# Altium PCB MOTHERBOARD.PcbDoc (part 1 of 2)
Units mm, origin at the board's own origin, x right, y up, seen from the top; angles counter-clockwise.
Board outline 100.2 x 110.2 mm, 2 copper layers (Top Layer, Bottom Layer); 252 components, 137 nets, 662 pads, 40 vias.
Unrouted connection lines stored in the file: 342.
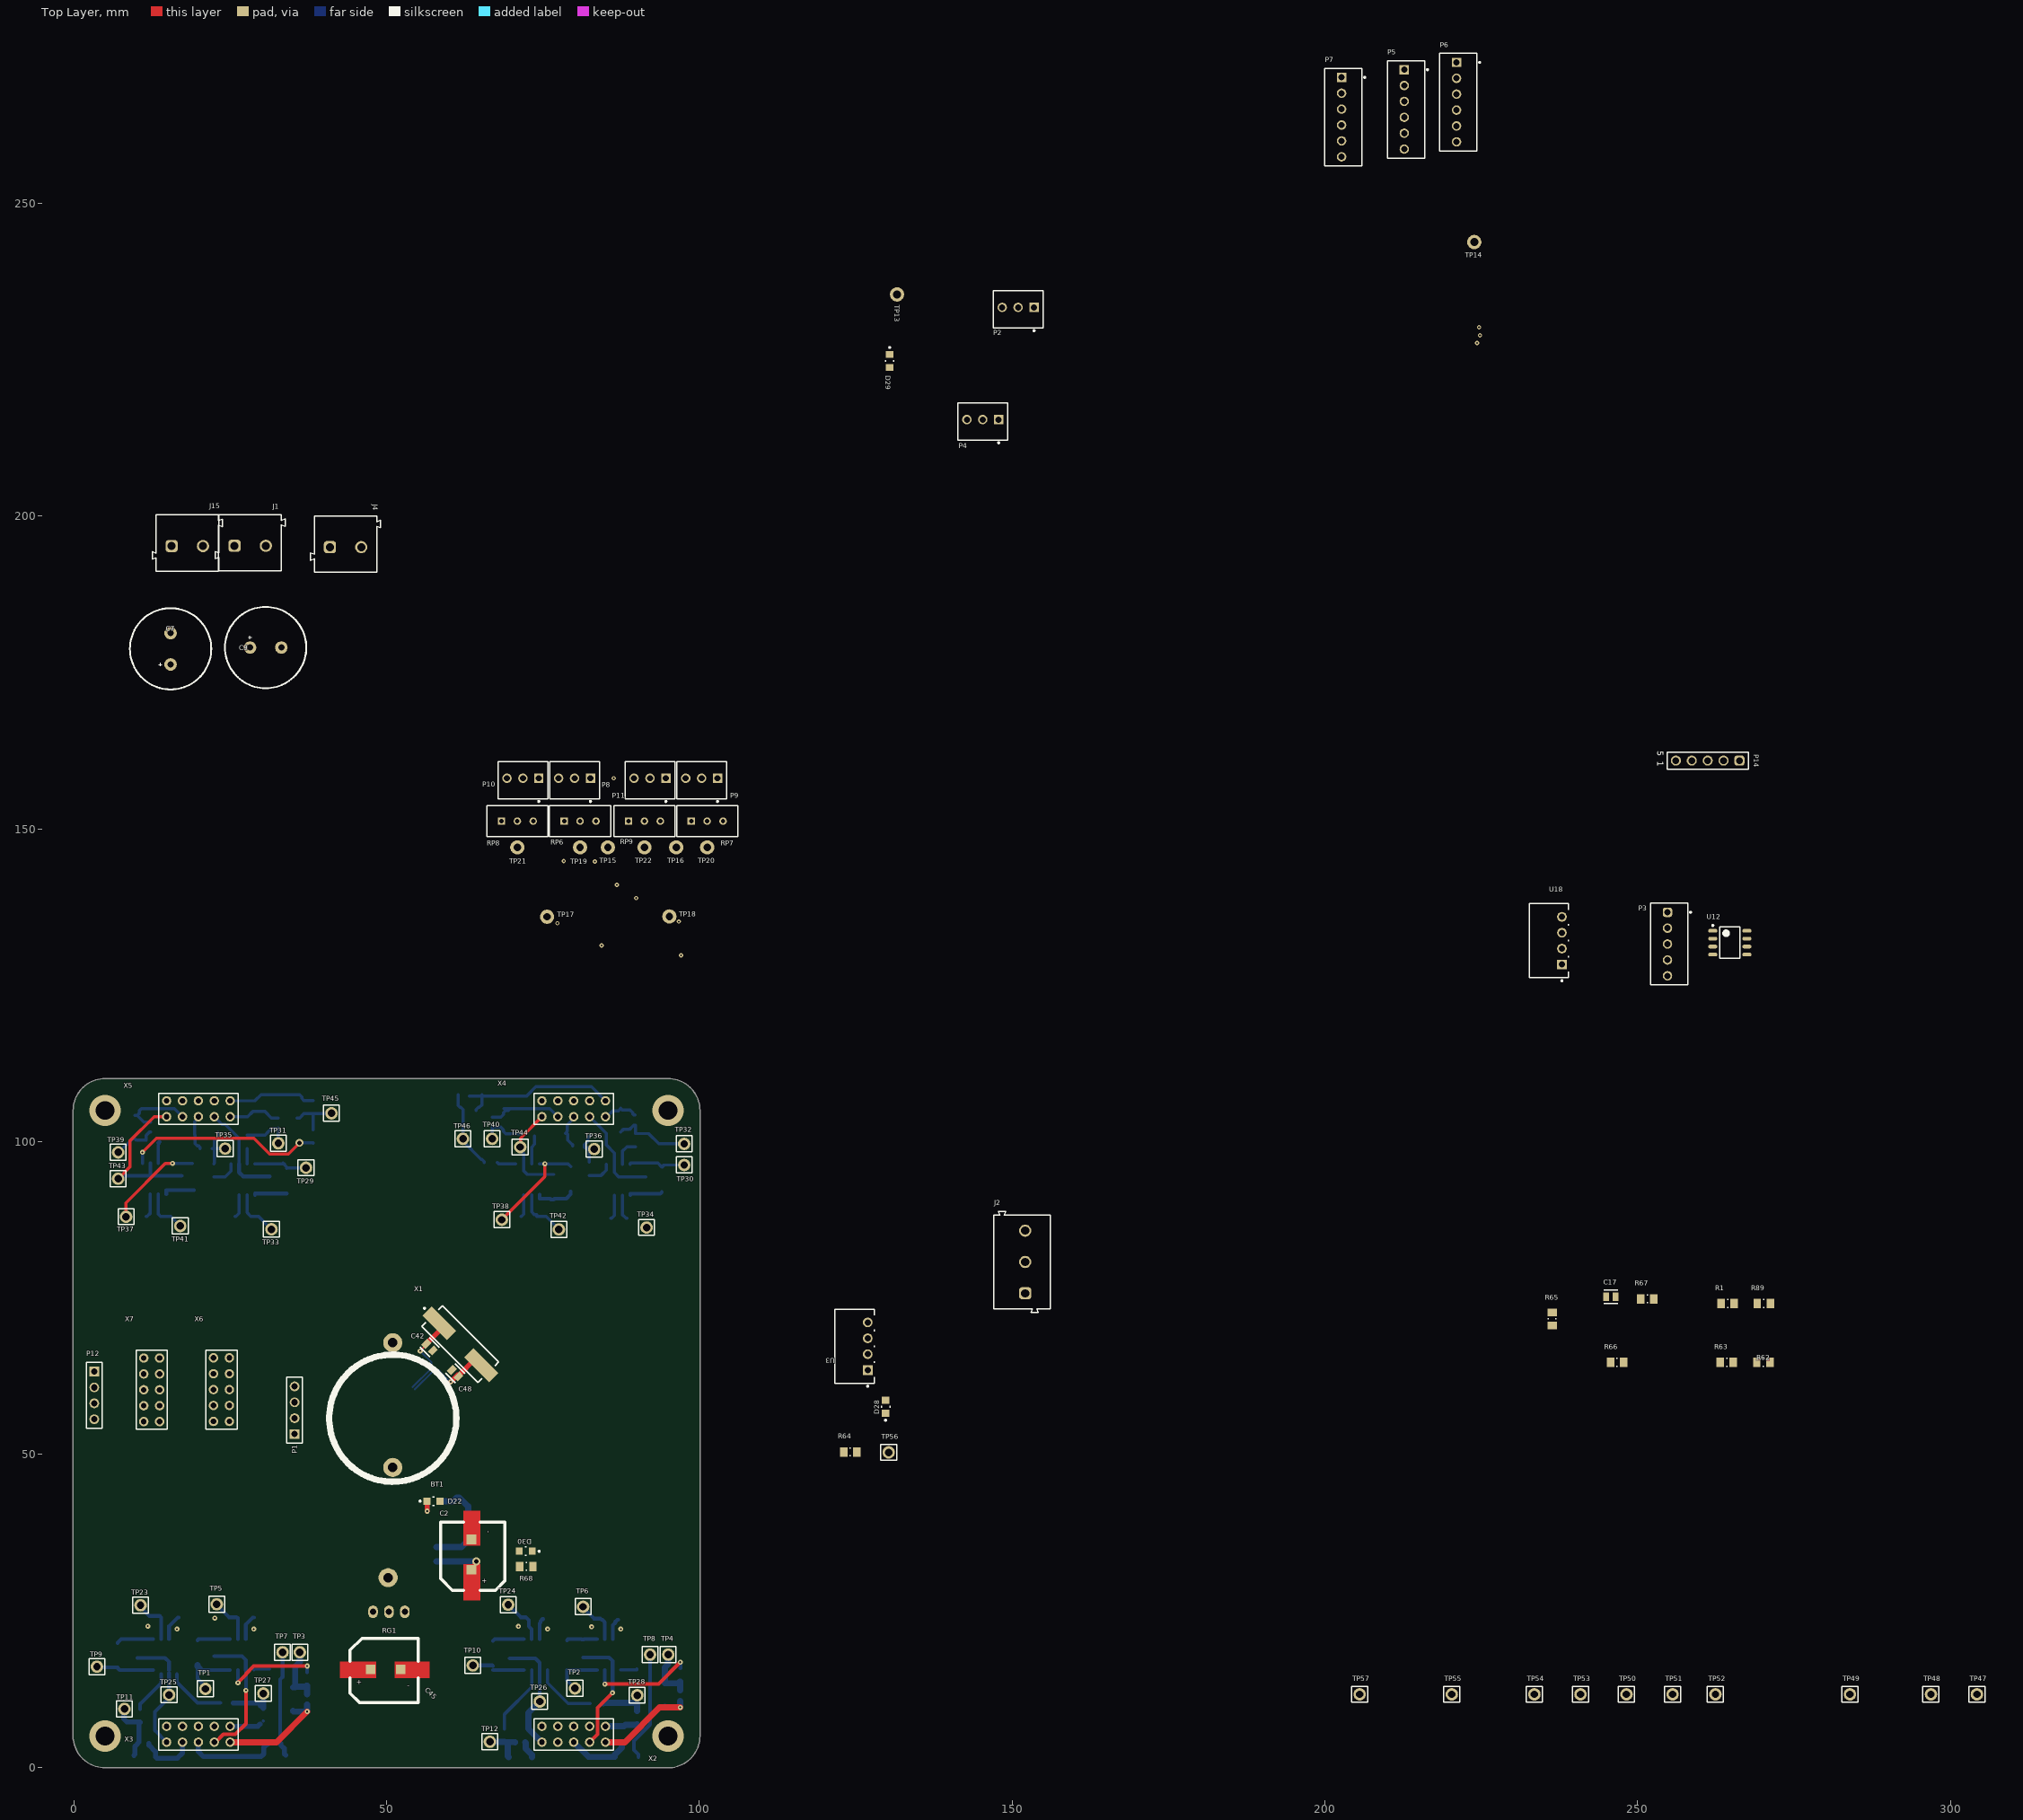
[diagram p0: Top Layer view]
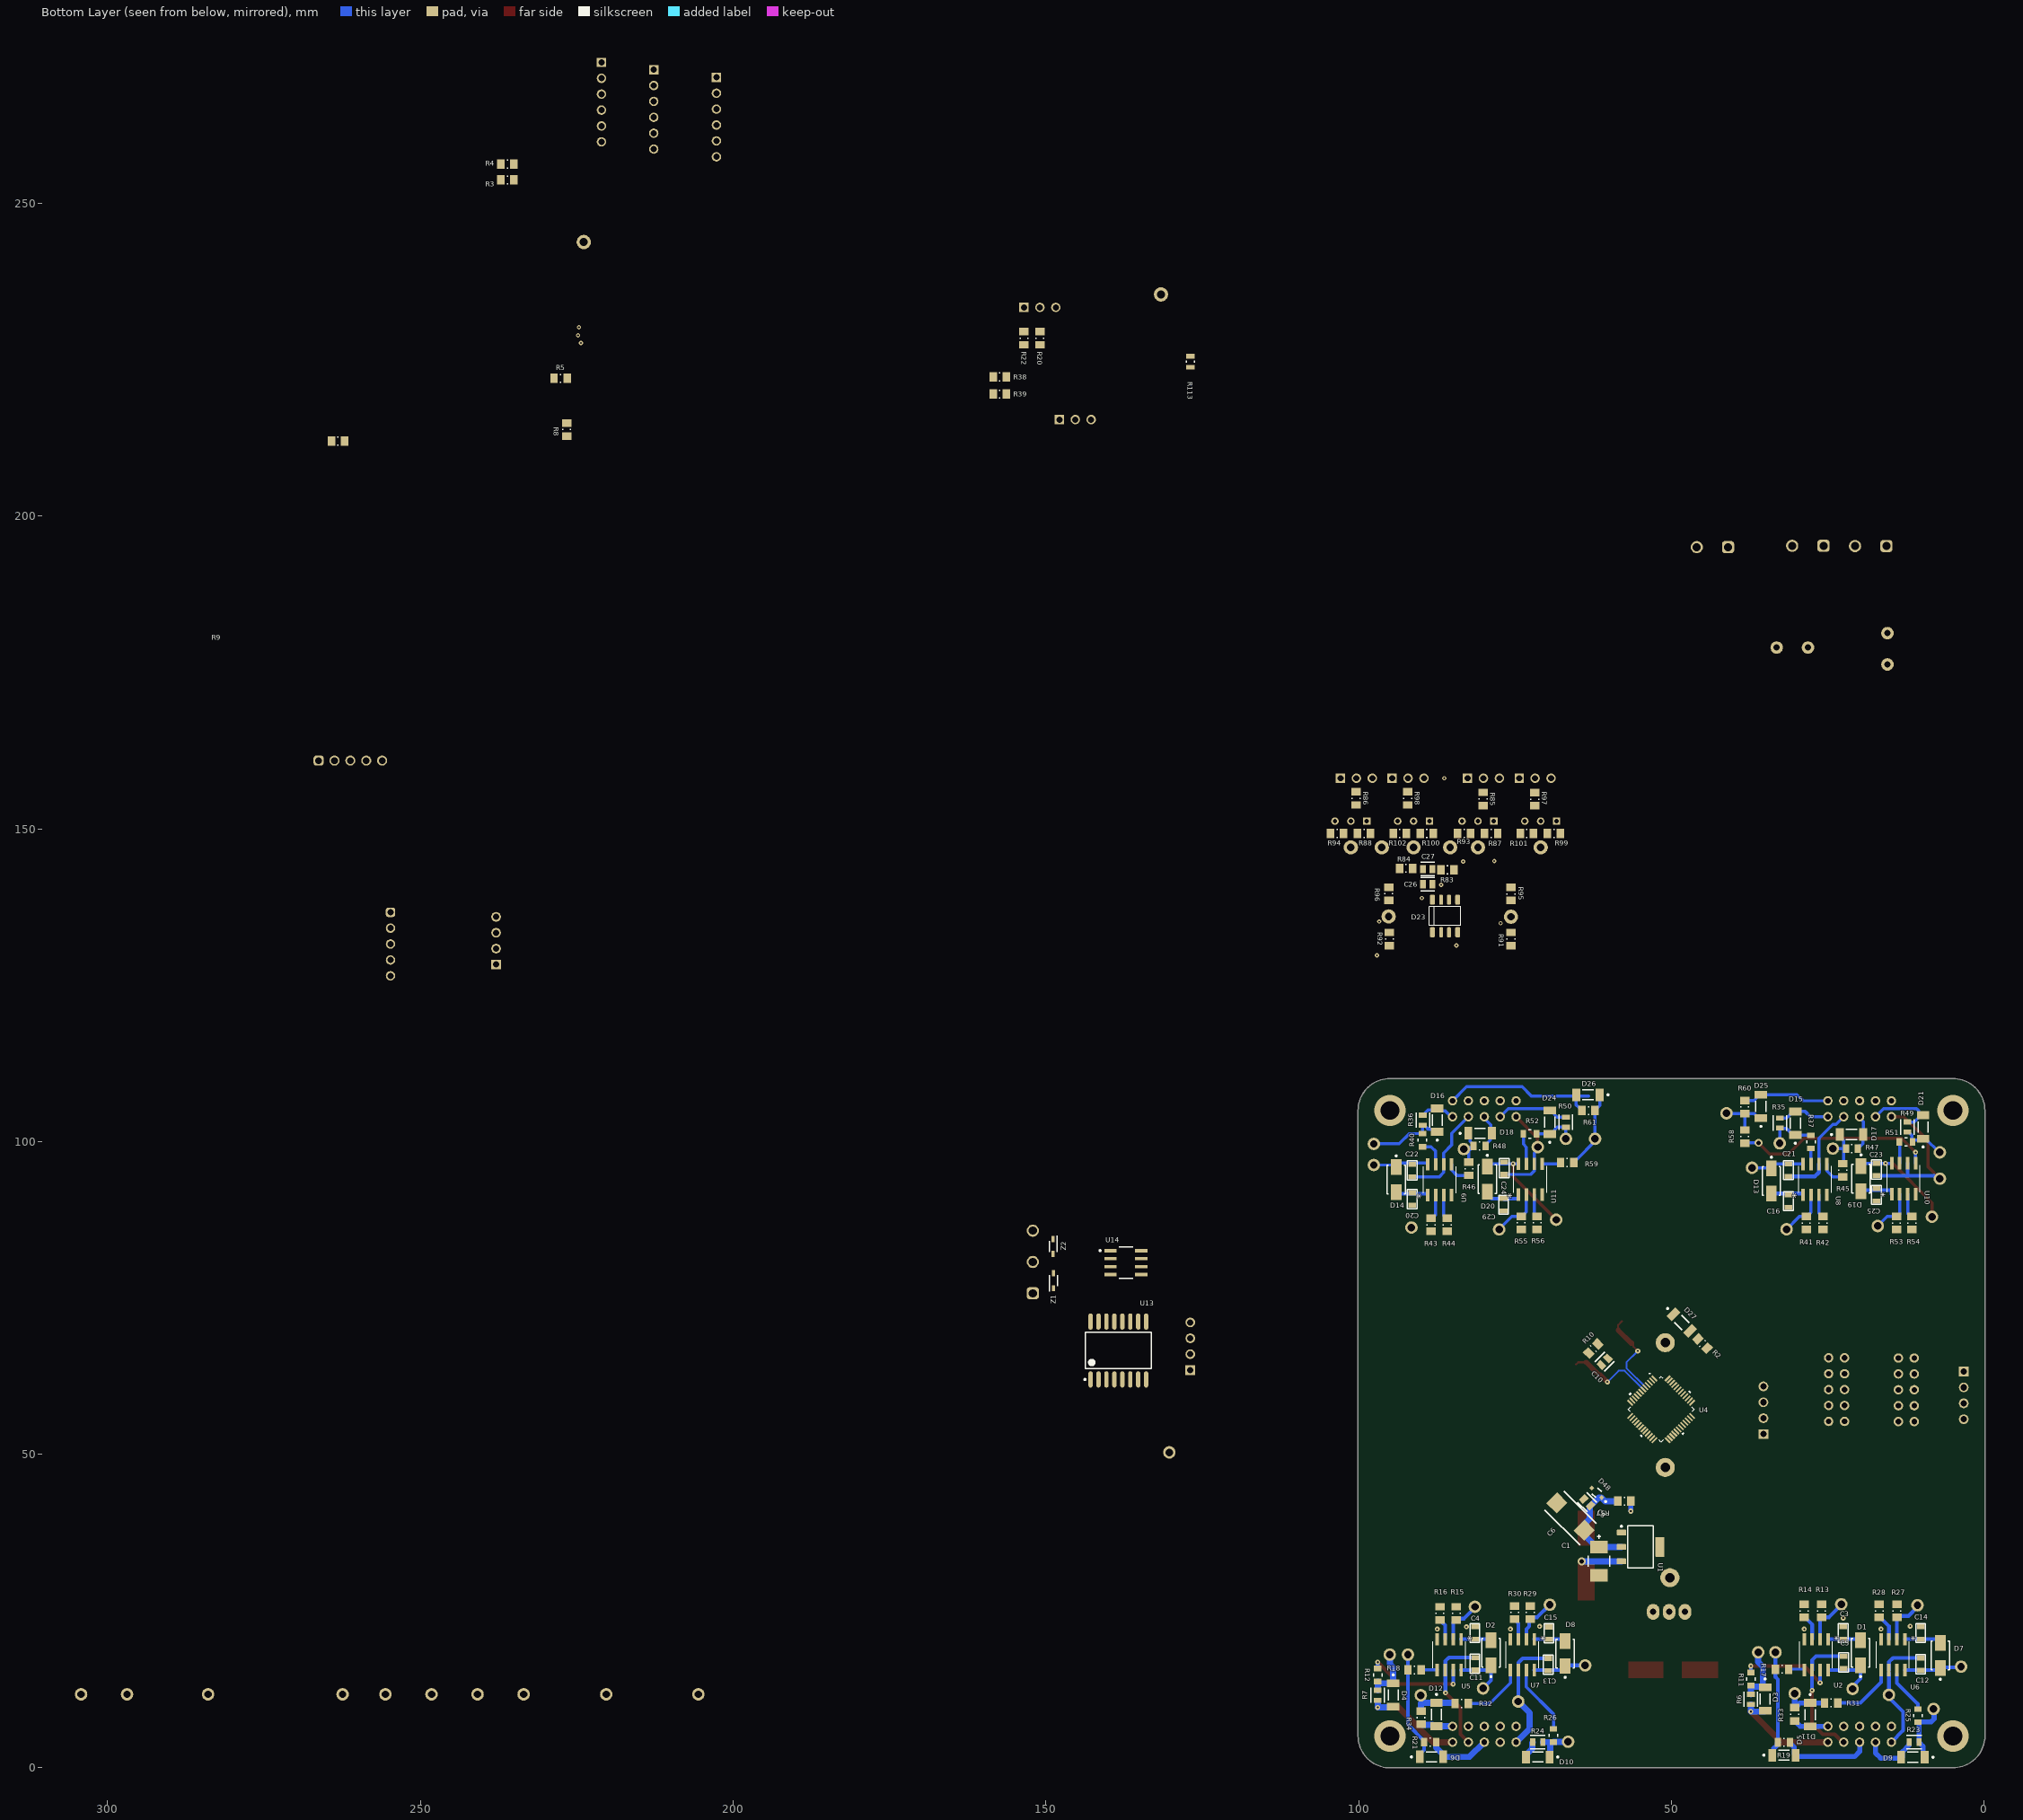
[diagram p1: Bottom Layer view, seen from below]

## Layer stack, top to bottom
Top Solder: solder mask 0.0102, Solder Resist, Dk 3.5
Top Layer: signal copper 0.0356
Dielectric 1: dielectric 0.32, FR-4, Dk 4.8
Bottom Layer: signal copper 0.0356
Bottom Solder: solder mask 0.0102, Solder Resist, Dk 3.5

## Board outline
-0.063,4.381 ccw(c5,5) 4.999,-0.1 ccw(c5,-0.004) 5,-0.1 95,-0.1 ccw(c95,5) 100.1,5 ccw(c100,5) 100.1,5.002 100.1,105 ccw(c100,105) 100.1,105.001 ccw(c95,105) 95,110.1 5,110.1 ccw(c5,110) 4.999,110.1 cw(c4.999,108.825) 5,110.1 4.999,110.1 ccw(c5,105) -0.1,105.002 ccw(c1.175,105.001) -0.1,105 cw(c0.006,105.001) -0.1,105.002 -0.1,105 -0.1,4.459 ccw(c0,4.459)

## Design rules (kind name [scope] priority, off if disabled: settings)
Clearance HV [InNetClass('All Nets') vs InNetClass('HV')] p1: gap=0.4 ignorepadtopadclearanceinfootprint=FALSE except(0: Arc-Arc Arc-Track Track-Track Via-Via Via-Fill Via-Poly Via-Region Via-Text Via-Hole Text-Text Text-Hole; 0.1: Arc-SMDPad Track-SMDPad; 0.3: Arc-THPad Arc-Via Arc-Fill Arc-Poly Arc-Region Arc-Text Arc-Hole Track-THPad Track-Via Track-Fill Track-Poly Track-Region Track-Text Track-Hole)
Clearance Clearance_1 [All] p2: gap=0.1 ignorepadtopadclearanceinfootprint=TRUE
Clearance GND [InNet('GND')] p3: gap=0.15 ignorepadtopadclearanceinfootprint=TRUE except(0.4: Fill-Fill Fill-Poly Fill-Region Fill-Text Fill-Hole Poly-Poly Poly-Region Poly-Text Poly-Hole Region-Region Region-Text Region-Hole)
ComponentClearance [All] p1: gap=-2.254 collisioncheckmode=3 verticalgap=0.254 showdistances=FALSE
DiffPairsRouting [All] p1: maxlimit=0.254 minlimit=0.1 mostfreqgap=0.254 toplayer_minwidth=0.3 toplayer_maxwidth=2 toplayer_prefwidth=0.3 bottomlayer_minwidth=0.3 bottomlayer_maxwidth=2 bottomlayer_prefwidth=0.3 maxuncoupledlength=12.7
Height [All] p1: minheight=0 maxheight=55.4 prefheight=12.7
HoleSize [All] p1: absolutevalues=TRUE maxlimit=5 minlimit=0.025 maxpercent=80.000 minpercent=20.000
HoleToHoleClearance [All] p1: gap=0 allowstackedmicrovias=TRUE
LayerPairs [All] p1 off: enforce=TRUE
MinimumSolderMaskSliver [All] p1: minsoldermaskwidth=0.01
PasteMaskExpansion [All] p1: expansion=0.5
PlaneClearance [All] p1: clearance=0.1
PlaneConnect [All] p1: planeconnectstyle=Direct reliefexpansion=0.508 reliefentries=4 reliefconductorwidth=0.254 reliefairgap=0.254
PolygonConnect [All] p1: connectstyle=Direct reliefconductorwidth=0.254 reliefentries=4 polygonreliefangle="90 Angle" airgapwidth=0.254
RoutingVias [All] p1: holewidth=0.4 width=0.8 viastyle="Through Hole" minholewidth=0.254 minwidth=0.5 maxholewidth=0.75 maxwidth=1.5
ShortCircuit [All] p1: allowed=TRUE
SilkToSilkClearance [All] p1 off: silktosilkclearance=0.01
SilkToSolderMaskClearance [All] p1: minsilkscreentomaskgap=0 clearancetoexposedcopper=TRUE
SolderMaskExpansion [All] p1: expansion=0.15 istentingtop=FALSE
Width [All] p1: maxlimit=10 minlimit=0.254 preferedwidth=2
17 further rules are at their usual default settings.

## Components (designator, comment, footprint, x,y, rotation, side; value= is the part's Value field where it differs from the comment)
BT1 "CR2032_BAT" CR2032_BAT 50.996,55.799 r90 top locked
C1 "TAJC476M016RNJ" FP-TAJC-MFG 61.6,32.925 r90 bottom locked
C2 "1000uF_10V" 1000uF_10V_Size_F 67,34 r270 top locked
C3 "CAP-NON-POLAR" CAP-0805 22.55,21.449 r270 bottom
C4 "CAP-NON-POLAR" CAP-0805 81.421,21.449 r270 bottom
C5 "CAP-NON-POLAR" CAP-0805 22.475,16.75 r270 bottom
C6 "293D106X9050E2TE3" CAPPM7343X430N 66.144,40.063 r45 bottom locked
C7 "25V 2200uF" CAPPOL-12x25 15.475,178.8 r90 top
C8 "C0805C224K5RACTU" FP-C0805C-DN-MFG 63.477,42.349 r45 bottom locked value="0.22 μF"
C9 "25V 2200uF" CAPPOL-12x25 30.675,179 r0 top
C10 "C0805C224K5RACTU" FP-C0805C-DN-MFG 60.683,64.828 r135 bottom locked value="0.22 μF"
C11 "CAP-NON-POLAR" CAP-0805 81.421,16.536 r270 bottom
C12 "CAP-NON-POLAR" CAP-0805 10.15,16.475 r270 bottom
C13 "CAP-NON-POLAR" CAP-0805 69.7,16.4 r270 bottom
C14 "CAP-NON-POLAR" CAP-0805 10.15,21.449 r270 bottom
C15 "CAP-NON-POLAR" CAP-0805 69.597,21.425 r270 bottom
C16 "CAP-NON-POLAR" CAP-0805 31.3,90.512 r90 bottom
C17 "C0805C224K5RACTU" FP-C0805C-DN-MFG 245.746,75.234 r0 top value="0.22 μF"
C20 "CAP-NON-POLAR" CAP-0805 91.456,90.826 r90 bottom
C21 "CAP-NON-POLAR" CAP-0805 31.3,95.44 r90 bottom
C22 "CAP-NON-POLAR" CAP-0805 91.456,95.404 r90 bottom
C23 "CAP-NON-POLAR" CAP-0805 17.243,95.565 r90 bottom
C24 "CAP-NON-POLAR" CAP-0805 76.738,95.771 r90 bottom
C25 "CAP-NON-POLAR" CAP-0805 17.243,91.489 r90 bottom
C26 "C0805C224K5RACTU" FP-C0805C-DN-MFG 88.99,141.168 r0 bottom value="0.22 μF"
C27 "C0805C224K5RACTU" FP-C0805C-DN-MFG 88.99,143.581 r0 bottom value="0.22 μF"
C29 "CAP-NON-POLAR" CAP-0805 76.838,89.916 r90 bottom
C42 "16pF" FP-C0805C-DN-MFG 56.875,67.15 r315 top value="0.22 μF"
C45 "1000uF_10V" 1000uF_10V_Size_F 49.875,12.225 r180 top
C48 "16pF" FP-C0805C-DN-MFG 60.966,62.989 r135 top value="0.22 μF"
D1 "US1G-13-F" FP-SMA-MFG 19.775,18.305 r90 bottom value=20pF
D2 "US1G-13-F" FP-SMA-MFG 78.852,18.305 r90 bottom value=20pF
D3 "LL4448-GS08" FP-6_560-5005_01-4-MFG 35.029,10.905 r270 bottom value=4pF
D4 "LL4448-GS08" FP-6_560-5005_01-4-MFG 94.488,11.55 r270 bottom value=4pF
D5 "LL4448-GS08" FP-6_560-5005_01-4-MFG 32.025,1.925 r180 bottom value=4pF
D6 "LL4448-GS08" FP-6_560-5005_01-4-MFG 88.375,1.65 r180 bottom value=4pF
D7 "US1G-13-F" FP-SMA-MFG 7.025,17.85 r90 bottom value=20pF
D8 "US1G-13-F" FP-SMA-MFG 67,18.175 r90 bottom locked value=20pF
D9 "LL4448-GS08" FP-6_560-5005_01-4-MFG 11.402,1.6 r0 bottom value=4pF
D10 "LL4448-GS08" FP-6_560-5005_01-4-MFG 71.375,1.625 r0 bottom value=4pF
D11 "LL4448-GS08" FP-6_560-5005_01-4-MFG 27.825,8.411 r270 bottom value=4pF
D12 "LL4448-GS08" FP-6_560-5005_01-4-MFG 87.575,8.425 r270 bottom value=4pF
D13 "US1G-13-F" FP-SMA-MFG 34.025,93.725 r270 bottom value=20pF
D14 "US1G-13-F" FP-SMA-MFG 94,93.925 r270 bottom value=20pF
D15 "LL4448-GS08" FP-6_560-5005_01-4-MFG 30.2,102.95 r90 bottom value=4pF
D16 "LL4448-GS08" FP-6_560-5005_01-4-MFG 87.45,103.45 r90 bottom value=4pF
D17 "LL4448-GS08" FP-6_560-5005_01-4-MFG 21.223,101.152 r180 bottom value=4pF
D18 "LL4448-GS08" FP-6_560-5005_01-4-MFG 80.597,101.346 r180 bottom value=4pF
D19 "US1G-13-F" FP-SMA-MFG 19.696,94.086 r270 bottom value=20pF
D20 "US1G-13-F" FP-SMA-MFG 79.45,94.021 r270 bottom value=20pF
D21 "LL4448-GS08" FP-6_560-5005_01-4-MFG 9.77,102.359 r90 bottom value=4pF
D22 "151031YS06000" LED_Yellow 57.5,42.525 r0 top
D23 "LMV358AIDR" 8-SOIC 86.196,136.088 r90 bottom
D24 "LL4448-GS08" FP-6_560-5005_01-4-MFG 69.458,103.116 r90 bottom value=4pF
D25 "LL4448-GS08" FP-6_560-5005_01-4-MFG 35.713,105.65 r90 bottom value=4pF
D26 "LL4448-GS08" FP-6_560-5005_01-4-MFG 63.348,107.5 r0 bottom value=4pF
D27 "LL4448-GS08" FP-6_560-5005_01-4-MFG 48.35,71.075 r225 bottom value=4pF
D28 "151031YS06000" LED_BLUE 129.8,57.625 r90 top
D29 "151031YS06000" Wurth_Electronics_0_MFG 130.425,224.825 r270 top
D30 "151031YS06000" LED_Yellow 72.25,34.55 r180 top
D48 "BZX384-C5V1,115" FP-SOD323-MFG 61.953,43.873 r45 bottom locked
J1 "691101710002" 691101710002 28.2,195.775 r0 top
J2 "691101710003" 691101710003 151.6,80.775 r90 top
J4 "691101710002" 691101710002 43.45,195.55 r0 top
J15 "691101710002" 691101710002 18.15,195.725 r0 top
P1 "TSW-104-08-G-S" SMTC-TSW-104-08-X-S 35.3,53.26 r90 top
P2 "61900311121" 61900311121 150.967,233.079 r0 top
P3 "61900511121" 61900511121 255.076,131.601 r90 top
P4 "61900311121" 61900311121 145.31,215.15 r0 top
P5 "61900611121" 61900611121 213,265.045 r90 top
P6 "61900611121" 61900611121 221.35,266.2 r90 top
P7 "61900611121" 61900611121 202.975,263.81 r90 top
P8 "61900311121" 61900311121 80.05,157.809 r0 top
P9 "61900311121" 61900311121 100.37,157.809 r0 top
P10 "61900311121" 61900311121 71.795,157.809 r0 top
P11 "61900311121" 61900311121 92.115,157.809 r0 top
P12 "TSW-104-08-G-S" SMTC-TSW-104-08-X-S 3.275,63.255 r270 top
P14 "61300511121" 61300511121 261.2,160.925 r180 top
R1 "10K" Vishay_CRCW0805-e3_IPC_A 264.403,74.126 r0 top
R2 "10K" Vishay_CRCW0805-e3_IPC_A 45.046,67.723 r45 bottom
R3 "10K" Vishay_CRCW0805-e3_IPC_A 236.092,253.754 r0 bottom
R4 "10K" Vishay_CRCW0805-e3_IPC_A 236.092,256.294 r0 bottom
R5 "10K" Vishay_CRCW0805-e3_IPC_A 227.595,222.026 r0 bottom
R6 "RT0805FRE0710RL" FP-RT0805-IPC_C 37.304,10.855 r270 bottom value=10Ω
R7 "RT0805FRE0710RL" FP-RT0805-IPC_C 96.963,11.5 r270 bottom value=10Ω
R8 "10K" Vishay_CRCW0805-e3_IPC_A 226.625,213.849 r270 bottom
R9 "10K" Vishay_CRCW0805-e3_IPC_A 263.183,212.012 r0 bottom
R10 "10K" Vishay_CRCW0805-e3_IPC_A 62.496,66.924 r315 bottom
R11 "RT0805FRE0710RL" FP-RT0805-MFG 37.304,14.105 r270 bottom value=10Ω
R12 "RT0805FRE0710RL" FP-RT0805-MFG 96.963,14.75 r270 bottom value=10Ω
R13 "10K" FP-CRCW0805-e3-IPC_A 26.018,25 r270 bottom
R14 "CRCW080510K0FKEA" FP-CRCW0805-e3-IPC_A 28.78,25 r270 bottom
R15 "10K" FP-CRCW0805-e3-IPC_A 84.381,24.6 r270 bottom
R16 "CRCW080510K0FKEA" FP-CRCW0805-e3-IPC_A 87.025,24.6 r270 bottom
R17 "10" Vishay_CRCW0805-e3_IPC_A 32.325,15.675 r180 bottom
R18 "10" Vishay_CRCW0805-e3_IPC_A 91.081,15.536 r180 bottom
R19 "10" FP-CRCW0805-e3-IPC_B 32.025,3.977 r0 bottom
R20 "33K" Vishay_CRCW0805-e3_IPC_A 150.967,228.454 r90 bottom
R21 "10" FP-CRCW0805-e3-IPC_B 88.575,4 r0 bottom
R22 "33K" Vishay_CRCW0805-e3_IPC_A 153.507,228.454 r90 bottom
R23 "RT0805FRE0710RL" FP-RT0805-IPC_C 11.2,4 r0 bottom value=10Ω
R24 "RT0805FRE0710RL" FP-RT0805-IPC_C 71.375,4 r0 bottom value=10Ω
R25 "RT0805FRE0710RL" FP-RT0805-MFG 10.6,8.25 r270 bottom value=10Ω
R26 "RT0805FRE0710RL" FP-RT0805-MFG 68.875,5.075 r270 bottom value=10Ω
R27 "10K" FP-CRCW0805-e3-IPC_A 13.965,25 r270 bottom
R28 "CRCW080510K0FKEA" FP-CRCW0805-e3-IPC_A 16.784,25 r270 bottom
R29 "10K" FP-CRCW0805-e3-IPC_A 72.56,24.723 r270 bottom
R30 "CRCW080510K0FKEA" FP-CRCW0805-e3-IPC_A 75.05,24.723 r270 bottom
R31 "10" Vishay_CRCW0805-e3_IPC_A 24.47,10.286 r180 bottom
R32 "10" Vishay_CRCW0805-e3_IPC_A 83.541,10.187 r180 bottom
R33 "10" Vishay_CRCW0805-e3_IPC_A 30.3,8.461 r90 bottom
R34 "10" Vishay_CRCW0805-e3_IPC_A 90.029,7.925 r90 bottom
R35 "RT0805FRE0710RL" FP-RT0805-IPC_C 32.667,103 r90 bottom value=10Ω
R36 "RT0805FRE0710RL" FP-RT0805-IPC_C 89.749,103.45 r90 bottom value=10Ω
R37 "RT0805FRE0710RL" FP-RT0805-MFG 27.695,99.975 r90 bottom value=10Ω
R38 "33K" Vishay_CRCW0805-e3_IPC_A 157.379,222.276 r180 bottom
R39 "10K" Vishay_CRCW0805-e3_IPC_A 157.379,219.526 r180 bottom
R40 "RT0805FRE0710RL" FP-RT0805-MFG 89.806,100.25 r90 bottom value=10Ω
R41 "10K" FP-CRCW0805-e3-IPC_A 28.467,87 r90 bottom locked
R42 "CRCW080510K0FKEA" FP-CRCW0805-e3-IPC_A 25.767,87 r90 bottom locked
R43 "10K" FP-CRCW0805-e3-IPC_A 88.425,86.725 r90 bottom
R44 "CRCW080510K0FKEA" FP-CRCW0805-e3-IPC_A 85.86,86.725 r90 bottom
R45 "10" Vishay_CRCW0805-e3_IPC_A 22.605,95.44 r270 bottom
R46 "10" Vishay_CRCW0805-e3_IPC_A 82.385,95.675 r270 bottom
R47 "10" FP-CRCW0805-e3-IPC_B 21.151,98.902 r0 bottom
R48 "10" FP-CRCW0805-e3-IPC_B 80.67,99.321 r0 bottom
R49 "RT0805FRE0710RL" FP-RT0805-IPC_C 12.28,102.357 r90 bottom value=10Ω
R50 "RT0805FRE0710RL" FP-RT0805-IPC_C 66.883,103.116 r90 bottom value=10Ω
R51 "RT0805FRE0710RL" FP-RT0805-MFG 12.524,99.969 r180 bottom value=10Ω
R52 "RT0805FRE0710RL" FP-RT0805-MFG 72.625,101.241 r180 bottom value=10Ω
R53 "10K" FP-CRCW0805-e3-IPC_A 14.04,87 r90 bottom locked
R54 "CRCW080510K0FKEA" FP-CRCW0805-e3-IPC_A 11.554,87 r90 bottom locked
R55 "10K" FP-CRCW0805-e3-IPC_A 74.035,87.025 r90 bottom
R56 "CRCW080510K0FKEA" FP-CRCW0805-e3-IPC_A 71.478,87.025 r90 bottom
R57 "220" Vishay_CRCW0805-e3_IPC_A 57.526,42.525 r0 bottom
R58 "10" Vishay_CRCW0805-e3_IPC_A 38.288,100.825 r270 bottom
R59 "10" Vishay_CRCW0805-e3_IPC_A 66.675,96.675 r0 bottom
R60 "10" Vishay_CRCW0805-e3_IPC_A 38.288,105.55 r270 bottom
R61 "10" Vishay_CRCW0805-e3_IPC_A 63.276,104.982 r180 bottom
R62 "100" Vishay_CRCW0805-e3_IPC_A 270.097,64.734 r0 top
R63 "100" Vishay_CRCW0805-e3_IPC_A 264.247,64.734 r0 top
R64 "220" Vishay_CRCW0805-e3_IPC_A 124.125,50.4 r0 top
R65 "10K" Vishay_CRCW0805-e3_IPC_A 236.338,71.674 r90 top
R66 "10K" Vishay_CRCW0805-e3_IPC_A 246.721,64.734 r0 top
R67 "10K" Vishay_CRCW0805-e3_IPC_A 251.554,74.88 r0 top
R68 "220" Vishay_CRCW0805-e3_IPC_A 72.351,32.1 r180 top
R83 "100k" Vishay_CRCW0805-e3_IPC_A 85.815,143.454 r0 bottom
R84 "100k" Vishay_CRCW0805-e3_IPC_A 92.419,143.708 r0 bottom
R85 "47k" Vishay_CRCW0805-e3_IPC_A 80.1,154.792 r270 bottom
R86 "47k" Vishay_CRCW0805-e3_IPC_A 100.42,154.884 r270 bottom
R87 "47k" Vishay_CRCW0805-e3_IPC_A 78.83,149.296 r180 bottom
R88 "47k" FP-CRCW0805-e3-IPC_A 99.15,149.296 r180 bottom
R89 "10K" Vishay_CRCW0805-e3_IPC_A 270.178,74.126 r0 top
R91 "1K" Vishay_CRCW0805-e3_IPC_A 75.655,132.405 r270 bottom
R92 "1K" Vishay_CRCW0805-e3_IPC_A 95.086,132.405 r270 bottom
R93 "47k" Vishay_CRCW0805-e3_IPC_A 83.148,149.296 r180 bottom
R94 "47k" Vishay_CRCW0805-e3_IPC_A 103.468,149.296 r180 bottom
R95 "2.2K" Vishay_CRCW0805-e3_IPC_A 75.673,139.626 r270 bottom
R96 "2.2K" Vishay_CRCW0805-e3_IPC_A 95.213,139.644 r270 bottom
R97 "47k" Vishay_CRCW0805-e3_IPC_A 71.845,154.757 r270 bottom
R98 "CRCW080510K0FKEA" FP-CRCW0805-e3-IPC_A 92.165,154.884 r270 bottom
R99 "47k" Vishay_CRCW0805-e3_IPC_A 68.797,149.296 r180 bottom
R100 "47k" Vishay_CRCW0805-e3_IPC_A 89.117,149.296 r180 bottom
R101 "47k" Vishay_CRCW0805-e3_IPC_A 73.115,149.296 r0 bottom
R102 "47k" Vishay_CRCW0805-e3_IPC_A 93.435,149.296 r0 bottom
R113 "220" Yageo_RC0805_IPC_C 126.902,224.7 r90 bottom
RG1 "Reg_Fairchild_LM7805CT_eec" TO-220(bend_rad) 50,35 r0 top locked
RP6 "10k" Bourns_3296W_MFG 80.939,151.256 r270 top
RP7 "10k" Bourns_3296W_MFG 101.259,151.256 r270 top
RP8 "10k" Bourns_3296W_MFG 70.906,151.256 r270 top
RP9 "10k" Bourns_3296W_MFG 91.226,151.256 r270 top
TP1 "Test_Point_PCB" Test_Point#1 21.045,12.525 r0 top
TP2 "Test_Point_PCB" Test_Point#1 80.122,12.6 r0 top
TP3 "Test_Point_PCB" Test_Point#1 36.129,18.375 r0 top
TP4 "Test_Point_PCB" Test_Point#1 95.032,18 r0 top
TP5 "Test_Point_PCB" Test_Point#1 22.85,26.051 r0 top
TP6 "Test_Point_PCB" Test_Point#1 81.421,25.651 r0 top
TP7 "Test_Point_PCB" Test_Point#1 33.376,18.375 r0 top
TP8 "Test_Point_PCB" Test_Point#1 92.132,18 r0 top
TP9 "Test_Point_PCB" Test_Point#1 3.7,16.075 r0 top
TP10 "Test_Point_PCB" Test_Point#1 63.8,16.275 r0 top
TP11 "Test_Point_PCB" Test_Point#1 8.1,9.316 r0 top
TP12 "Test_Point_PCB" Test_Point#1 66.525,4.075 r0 top
TP13 "Test_Point_PCB" Test_Point#2 131.61,235.454 r270 top
TP14 "Test_Point_PCB" Test_Point#2 223.887,243.824 r90 top
TP15 "Test_Point_PCB" Test_Point#3 85.384,147.06 r270 top
TP16 "Test_Point_PCB" Test_Point#3 96.306,147.06 r270 top
TP17 "Test_Point_PCB" Test_Point#3 75.66,135.965 r180 top
TP18 "Test_Point_PCB" Test_Point#3 95.213,136.014 r90 top
TP19 "Test_Point_PCB" Test_Point#3 80.939,147.06 r270 top
TP20 "Test_Point_PCB" Test_Point#3 101.259,147.06 r270 top
TP21 "Test_Point_PCB" Test_Point#3 70.906,147.06 r270 top
TP22 "Test_Point_PCB" Test_Point#3 91.226,147.06 r270 top
TP23 "Test_Point_PCB" Test_Point#1 10.675,25.896 r0 top
TP24 "Test_Point_PCB" Test_Point#1 69.45,25.975 r0 top
TP25 "Test_Point_PCB" Test_Point#1 15.235,11.562 r0 top
TP26 "Test_Point_PCB" Test_Point#1 74.5,10.5 r0 top
TP27 "Test_Point_PCB" Test_Point#1 30.3,11.78 r0 top
TP28 "Test_Point_PCB" Test_Point#1 90.081,11.502 r0 top
TP29 "Test_Point_PCB" Test_Point#1 37.125,95.825 r0 top
TP30 "Test_Point_PCB" Test_Point#1 97.587,96.276 r0 top
TP31 "Test_Point_PCB" Test_Point#1 32.7,99.75 r0 top
TP32 "Test_Point_PCB" Test_Point#1 97.582,99.65 r0 top
TP33 "Test_Point_PCB" Test_Point#1 31.6,86 r0 top
TP34 "Test_Point_PCB" Test_Point#1 91.576,86.277 r0 top
TP35 "Test_Point_PCB" Test_Point#1 24.2,98.902 r0 top
TP36 "Test_Point_PCB" Test_Point#1 83.197,98.821 r0 top
TP37 "Test_Point_PCB" Test_Point#1 8.355,88 r0 top
TP38 "Test_Point_PCB" Test_Point#1 68.429,87.525 r0 top
TP39 "Test_Point_PCB" Test_Point#1 7.1,98.3 r0 top
TP40 "Test_Point_PCB" Test_Point#1 66.883,100.466 r0 top
TP41 "Test_Point_PCB" Test_Point#1 17.025,86.53 r0 top
TP42 "Test_Point_PCB" Test_Point#1 77.545,85.974 r0 top
TP43 "Test_Point_PCB" Test_Point#1 7.095,94.086 r0 top
TP44 "Test_Point_PCB" Test_Point#1 71.375,99.138 r90 top
TP45 "Test_Point_PCB" Test_Point#1 41.2,104.55 r0 top
TP46 "Test_Point_PCB" Test_Point#1 62.225,100.466 r0 top
TP47 "Test_Point_PCB" Test_Point#1 304.248,11.653 r90 top
TP48 "Test_Point_PCB" Test_Point#1 296.898,11.653 r90 top
TP49 "Test_Point_PCB" Test_Point#1 283.947,11.653 r90 top
TP50 "Test_Point_PCB" Test_Point#1 248.22,11.653 r90 top
TP51 "Test_Point_PCB" Test_Point#1 255.596,11.653 r90 top
TP52 "Test_Point_PCB" Test_Point#1 262.446,11.653 r90 top
TP53 "Test_Point_PCB" Test_Point#1 240.87,11.653 r90 top
TP54 "Test_Point_PCB" Test_Point#1 233.494,11.653 r90 top
TP55 "Test_Point_PCB" Test_Point#1 220.294,11.653 r90 top
TP56 "Test_Point_PCB" Test_Point#1 130.275,50.325 r90 top
TP57 "Test_Point_PCB" Test_Point#1 205.568,11.653 r90 top
U1 "LM1117MPX-3.3/NOPB" DCY0004A_L 54.925,35.225 r180 bottom
U2 "IR2104SPBF" SOIC8_INF 26.875,18 r270 bottom locked
U3 "B0505S-1WR3" FP-B0505S-1WR3-MFG 124.825,67.3 r90 top
U4 "STM32F303CCT6" LQFP48-7x7mm 51.666,57.208 r225 bottom
U5 "IR2104SPBF" SOIC8_INF 85.536,18 r270 bottom locked
U6 "IR2104SPBF" SOIC8_INF 14.6,18 r270 bottom locked
U7 "IR2104SPBF" SOIC8_INF 73.839,18 r270 bottom locked
U8 "IR2104SPBF" SOIC8_INF 27.06,93.961 r90 bottom
U9 "IR2104SPBF" SOIC8_INF 87.05,93.925 r90 bottom locked
U10 "IR2104SPBF" SOIC8_INF 12.88,94.086 r90 bottom locked
U11 "IR2104SPBF" SOIC8_INF 72.565,94 r90 bottom locked
U12 "ADuM1250ARZ" ADI-R-8_N 264.75,131.825 r0 top
U13 "ADUM1401BRWZ" ADI-RW-16_M 138.425,66.625 r90 bottom
U14 "MAX485ECSA+" FP-S8-5-MFG 137.225,80.675 r180 bottom
U18 "B0505S-1WR3" FP-B0505S-1WR3-MFG 235.8,132.14 r90 top
X1 "ABLS-16.000MHZ-B4-T" ABRA-ABLS-14.7456MHZ-B2-T_V 61.789,67.631 r315 top
X2 "BH-10" BH-10 85,4 r180 top locked
X3 "BH-10" BH-10 25,4 r180 top locked
X4 "BH-10" BH-10 85,104 r180 top locked
X5 "BH-10" BH-10 25,104 r180 top locked
X6 "BH-10" BH-10 24.875,65.445 r270 top
X7 "BH-10" BH-10 13.725,65.415 r270 top
Z1 "MM3Z5V1ST1G" SOD2512X110N 148.8,77.775 r90 bottom
Z2 "MM3Z5V1ST1G" SOD2512X110N 148.85,83.25 r270 bottom

## Footprints (in the part's own frame and the unit in brackets; to place one, negate y for a bottom-side part, rotate by r counter-clockwise, add the part's x,y. Pads: shape width x height; smd on the part's side, far side on the other; paste and mask are expansions set on the pad)
8-SOIC [mm] "SOIC, 8-Leads, Body 4,90x3,90mm, Pitch 1,27mm, IPC Medium Density"
  rrect50% 1.6x0.8 smd: 1(-2.6,2.025) 4(-2.6,-2.025) 5(2.6,-2.025) 8(2.6,2.025)
  rrect50% 1.6x0.6 smd: 2(-2.6,0.635) 3(-2.6,-0.635) 6(2.6,-0.635) 7(2.6,0.635)
  silkscreen extent -1.5,-2.5 1.5,2.5, body extent -3,-2.45 3,2.45, height 1.75
1000uF_10V_Size_F [mil]
  rect 60x60 smd: 1(95,-135) 2(-95,-135)
  Top Layer region: -275.01,-185 -55.01,-185 -55.01,-80 -275.01,-80
  Top Layer region: 59.98,-185 289.98,-185 289.98,-80 59.98,-80
  silkscreen extent -205,-330 225,75, body extent -220,-330 241,76, height 406
61300511121 [mm] "Pin Header, pitch 2.54 mm, THT, Vertical, single row, 5p"
  rrect50% 1.6x1.6 hole 1.1: 1(-5.08,0)
  round 1.6 hole 1.1: 2(-2.54,0) 3(0,0) 4(2.54,0) 5(5.08,0)
  silkscreen extent -6.5,-1.35 6.5,1.35, body extent -6.35,-1.27 6.35,1.27, height 8.57
61900311121 [mm] "2.54mm Male Locking Header, 3p"
  rect 1.5x1.5 hole 1: 1(2.54,0.3)
  round 1.5 hole 1: 2(0,0.3) 3(-2.54,0.3)
  silkscreen extent -3.98,-3.52 3.98,2.98, body extent -3.81,-2.9 3.81,2.9, height 11.53
61900511121 [mm] "2.54mm Male Locking Header, 5p"
  rrect50% 1.5x1.5 hole 1: 1(5.08,0.3)
  round 1.5 hole 1: 2(2.54,0.3) 3(0,0.3) 4(-2.54,0.3) 5(-5.08,0.3)
  silkscreen extent -6.52,-3.52 6.52,2.98, body extent -6.35,-2.9 6.35,2.9, height 11.53
61900611121 [mm] "2.54mm Male Locking Header, 6p"
  rect 1.5x1.5 hole 1: 1(6.35,0.3)
  round 1.5 hole 1: 2(3.81,0.3) 3(1.27,0.3) 4(-1.27,0.3) 5(-3.81,0.3) 6(-6.35,0.3)
  silkscreen extent -7.79,-3.52 7.79,2.98, body extent -7.62,-2.9 7.62,2.9, height 11.53
691101710002 [mm] "5,00mm - modular - blue - Horizontal entry with pressure clamp - 12,6mm height - 02p"
  rrect50% 1.95x1.95 hole 1.3: 1(-2.5,-0.5)
  round 1.95 hole 1.3: 2(2.5,-0.5)
  silkscreen extent -5.6,-4.5 5.6,4.5, body extent -5.6,-4.5 5.6,4.5, height 12.65
691101710003 [mm] "5,00mm - modular - blue - Horizontal entry with pressure clamp - 12,6mm height - 03p"
  rrect50% 1.95x1.95 hole 1.3: 1(-5,-0.5)
  round 1.95 hole 1.3: 2(0,-0.5) 3(5,-0.5)
  silkscreen extent -8.1,-4.5 8.1,4.5, body extent -8.1,-4.5 8.1,4.5, height 12.65
ABRA-ABLS-14.7456MHZ-B2-T_V [mm] "SMD, 2-Leads, Body 11.4x4.7mm"
  rect 5.6x2.1 smd: 1(-4.75,0) 2(4.75,0)
  silkscreen extent -8.22,-2.35 6.35,2.35, body extent -6.35,-2.35 6.35,2.35, height 4.16
ADI-R-8_N [mm] "SOIC, 8-Leads, Body 5x4mm, Pitch 1.27mm, IPC Medium Density"
  oval 1.45x0.6 smd: 1(-2.725,1.905) 2(-2.725,0.635) 3(-2.725,-0.635) 4(-2.725,-1.905) 5(2.725,-1.905) 6(2.725,-0.635) 7(2.725,0.635) 8(2.725,1.905)
  silkscreen extent -2.85,-2.5 1.6,2.88, body extent -3,-2.5 3,2.5, height 1.75
ADI-RW-16_M [mm] "SOIC, 16-Leads, Body 10.3x7.5mm, Pitch 1.27mm, IPC Low Density"
  oval 2.6x0.7 smd: 1(-4.625,4.445) 2(-4.625,3.175) 3(-4.625,1.905) 4(-4.625,0.635) 5(-4.625,-0.635) 6(-4.625,-1.905) 7(-4.625,-3.175) 8(-4.625,-4.445) 9(4.625,-4.445) 10(4.625,-3.175) 11(4.625,-1.905) 12(4.625,-0.635) 13(4.625,0.635) 14(4.625,1.905) 15(4.625,3.175) 16(4.625,4.445)
  silkscreen extent -4.75,-5.25 2.93,5.47, body extent -3.8,-5.25 3.8,5.25, height 2.65
BH-10 [mm]
  round 1.5 hole 0.9: 1(0,0) 2(2.54,0) 3(5.08,0) 4(7.62,0) 5(10.16,0) 6(0,-2.54) 7(2.54,-2.54) 8(5.08,-2.54) 9(7.62,-2.54) 10(10.16,-2.54)
  silkscreen extent -1.25,-3.75 11.41,1.25, body extent -5.07,-5.82 15.23,3.28, height 9
Bourns_3296W_MFG [mm]
  rect 1.2x1.2 hole 0.7 paste-1000 mask+0: 1(0.005,-2.54)
  round 1.2 hole 0.7 paste-1000 mask+0: 2(0.005,0) 3(0.005,2.54)
  silkscreen extent -2.48,-4.89 2.48,4.89, body extent -2.58,-4.99 2.58,4.99, height 0.25
CAP-0805 [mm]
  rect 0.8x1.25 smd mask+0.015: 1(-1,0) 2(1,0)
  silkscreen extent -1.52,-0.76 1.52,0.76, body extent -1,-0.62 1,0.63, height 0.8
CAPPM7343X430N [mm]
  rect 2.35x2.45 smd: 1(-3.1,0) 2(3.1,0)
  silkscreen extent -4.27,-2.15 3.65,2.15, body extent -3.59,-2.35 3.6,2.35, height 4.12
CAPPOL-12x25 [mm]
  round 2 hole 1: 1(-2.5,0) 2(2.5,0)
  silkscreen extent -6.5,-6.5 6.5,6.5, body extent -6.25,-6.25 6.25,6.25, height 25
CR2032_BAT [mil]
  round 120 hole 60: 1(-310,0) 2(475,0)
  silkscreen extent -400,-400 400,400, body extent -432,-435 525,439, height 350
DCY0004A_L [mm] "SOT223, 4-Leads, Body 6.7x3.7mm, Pitch 2.3mm, IPC High Density"
  rrect11% 1.45x0.9 smd: 1(-3.075,2.3) 2(-3.075,0) 3(-3.075,-2.3)
  rrect7% 1.45x3.15 smd: 4(3.075,0)
  silkscreen extent -3.2,-3.35 2.05,3.42, body extent -3.5,-3.25 3.5,3.25, height 1.62
FP-6_560-5005_01-4-MFG [mm]
  rect 1.25x2 smd paste+0 mask+0: 1(-1.875,0) 2(1.875,0)
  silkscreen extent -3.32,-0.8 0.87,0.8, body extent -1.75,-0.8 1.75,0.8, height 1.6
FP-B0505S-1WR3-MFG [mm]
  rect 1.55x1.55 hole 1 paste-1000 mask+0: 1(-3.81,-2.1)
  round 1.55 hole 1 paste-1000 mask+0: 2(-1.27,-2.1) 3(1.27,-2.1) 4(3.81,-2.1)
  silkscreen extent -6.52,-3.13 5.92,3.13, body extent -5.8,-3 5.8,3, height 10.41
FP-C0805C-DN-MFG [mm]
  rect 0.95x1.35 smd paste+0 mask+0: 1(-0.75,0) 2(0.75,0)
  silkscreen extent -1.1,-1.07 1.1,1.07, body extent -1,-0.62 1,0.62, height 0.88
FP-CRCW0805-e3-IPC_A [mil]
  rect 47.5x59.38 smd paste+0 mask+0: 1(-41.37,0) 2(41.37,0)
  silkscreen extent -3,-25 3,25, body extent -39,-25 39,25, height 20
FP-CRCW0805-e3-IPC_B [mm]
  rect 1.007x1.408 smd paste+0 mask+0: 1(-0.951,0) 2(0.951,0)
  silkscreen extent -0.07,-0.63 0.07,0.63, body extent -1,-0.63 1,0.63, height 0.5
FP-RT0805-IPC_C [mm]
  rect 0.808x1.262 smd paste+0 mask+0: 1(-0.802,0) 2(0.802,0)
  silkscreen extent -1.21,-1.07 1.21,1.07, body extent -1,-0.63 1,0.63, height 0.6
FP-RT0805-MFG [mm]
  rect 0.9x1.2 smd paste+0 mask+0: 1(-1.05,0) 2(1.05,0)
  silkscreen extent -0.23,-0.67 0.23,0.67, body extent -1,-0.63 1,0.63, height 0.6
FP-S8-5-MFG [mm]
  rect 1.98x0.53 smd paste+0 mask+0: 1(-2.465,1.905) 2(-2.465,0.635) 3(-2.465,-0.635) 4(-2.465,-1.905) 5(2.465,-1.905) 6(2.465,-0.635) 7(2.465,0.635) 8(2.465,1.905)
  silkscreen extent -4.25,-2.5 1.1,2.5, body extent -3,-2.45 3,2.45, height 1.75
FP-SMA-MFG [mm]
  rect 2.5x1.7 smd paste+0 mask+0: 1(-2,0) 2(2,0)
  silkscreen extent -3.92,-1.46 2.3,1.46, body extent -2.6,-1.3 2.6,1.3, height 2.4
FP-SOD323-MFG [mm]
  rect 0.6x0.6 smd paste-1000 mask+0: 1(-1.1,0) 2(1.1,0)
  silkscreen extent -2.12,-0.67 0.42,0.67, body extent -1.25,-0.62 1.25,0.62, height 1.1
FP-TAJC-MFG [mm]
  rect 2x2.8 smd paste+0 mask+0: 1(-2.25,0) 2(2.25,0)
  silkscreen extent -0.87,-1.7 4.23,1.7, body extent -3,-1.6 3,1.6, height 2.8
LED_BLUE [mm]
  rect 1.1x1.2 smd paste+0 mask+0: 1(-1.05,0) 2(1.05,0)
  silkscreen extent -2.27,-0.67 0.13,0.67, body extent -1,-0.63 1,0.63, height 0.8
LED_Yellow [mm]
  rect 1.1x1.2 smd paste+0 mask+0: 1(-1.05,0) 2(1.05,0)
  silkscreen extent -2.27,-0.67 0.13,0.67, body extent -1,-0.63 1,0.63, height 0.8
LQFP48-7x7mm [mm]
  rect 1.194x0.305 smd paste+0 mask+0: 1(-4.25,2.75) 2(-4.25,2.25) 3(-4.25,1.75) 4(-4.25,1.25) 5(-4.25,0.75) 6(-4.25,0.25) 7(-4.25,-0.25) 8(-4.25,-0.75) 9(-4.25,-1.25) 10(-4.25,-1.75) 11(-4.25,-2.25) 12(-4.25,-2.75) 25(4.25,-2.75) 26(4.25,-2.25) 27(4.25,-1.75) 28(4.25,-1.25) 29(4.25,-0.75) 30(4.25,-0.25) 31(4.25,0.25) 32(4.25,0.75) 33(4.25,1.25) 34(4.25,1.75) 35(4.25,2.25) 36(4.25,2.75)
  rect 0.305x1.194 smd paste+0 mask+0: 13(-2.75,-4.25) 14(-2.25,-4.25) 15(-1.75,-4.25) 16(-1.25,-4.25) 17(-0.75,-4.25) 18(-0.25,-4.25) 19(0.25,-4.25) 20(0.75,-4.25) 21(1.25,-4.25) 22(1.75,-4.25) 23(2.25,-4.25) 24(2.75,-4.25) 37(2.75,4.25) 38(2.25,4.25) 39(1.75,4.25) 40(1.25,4.25) 41(0.75,4.25) 42(0.25,4.25) 43(-0.25,4.25) 44(-0.75,4.25) 45(-1.25,4.25) 46(-1.75,4.25) 47(-2.25,4.25) 48(-2.75,4.25)
  silkscreen extent -5.43,-5.35 5.35,5.35, body extent -4.5,-4.5 4.5,4.5, height 1.6
SMTC-TSW-104-08-X-S [mm] ".025 SQ Post Terminal Strip Assembly, 1x4 Pins, Vertical, 2.54mm Pitch, Male"
  rect 1.55x1.55 hole 1.02: 1(0,0)
  round 1.55 hole 1.02: 2(2.54,0) 3(5.08,0) 4(7.62,0)
  silkscreen extent -1.46,-1.27 9.08,1.27, body extent -1.27,-1.27 8.89,1.27, height 8.38
SOD2512X110N [mm]
  rect 1x0.5 smd: 1(-1.2,0) 2(1.2,0)
  silkscreen extent -1.7,-0.63 0.85,0.63, body extent -1.25,-0.63 1.25,0.63, height 1.1
SOIC8_INF [mm]
  rect 1.97x0.558 smd paste+0 mask+0: 1(-2.464,1.905) 2(-2.464,0.635) 3(-2.464,-0.635) 4(-2.464,-1.905) 5(2.464,-1.905) 6(2.464,-0.635) 7(2.464,0.635) 8(2.464,1.905)
  silkscreen extent -2.12,-2.63 2.12,2.63, body extent -3.1,-2.5 3.1,2.5, height 1.76
Test_Point#1 [mm] "Контак на плате, диаметр 0.6 мм"
  round 2 hole 1.2: 1(0,0)
  silkscreen extent -1.27,-1.27 1.26,1.3, body extent -1.27,-1.27 1.26,1.27, height 4.63
Test_Point#2 [mm]
  round 2.286 hole 1.27 paste+0.102 mask+0.102: 1(0,0)
Test_Point#3 [mm]
  round 2.286 hole 1.2 paste+0.102 mask+0.102: 1(0,0)
TO-220(bend_rad) [mil]
  oval 60x80 / inner oval 75x90 / far side oval 80x100 hole 40: 1(-85,-400) 2(15,-400) 3(115,-400)
  round 120 hole 60: 2(10,-185)
  body extent -285,-481 306,-50, height 994
Vishay_CRCW0805-e3_IPC_A [mil]
  rect 47.5x59.38 smd paste+0 mask+0: 1(-41.37,0) 2(41.37,0)
  silkscreen extent -3,-25 3,25, body extent -85,-49 85,49, height 10
Wurth_Electronics_0_MFG [mm]
  rect 1.1x1.2 smd paste+0 mask+0: 1(-1.05,0) 2(1.05,0)
  silkscreen extent -2.27,-0.67 0.13,0.67, body extent -1.7,-0.77 1.7,0.77, height 0.25
Yageo_RC0805_IPC_C [mm]
  rect 0.757x1.308 smd paste+0 mask+0: 1(-0.876,0) 2(0.876,0)
  silkscreen extent -0.12,-0.63 0.12,0.63, body extent -1,-0.62 1,0.63, height 0.6